# Altium PCB PCB.PcbDoc
Units mm, origin at the board's own origin, x right, y up, seen from the top; angles counter-clockwise.
Board outline 93.85 x 91.31 mm, 2 copper layers (Top Layer, Bottom Layer); 18 components, 20 nets, 160 pads, 0 vias.
Unrouted connection lines stored in the file: 1.
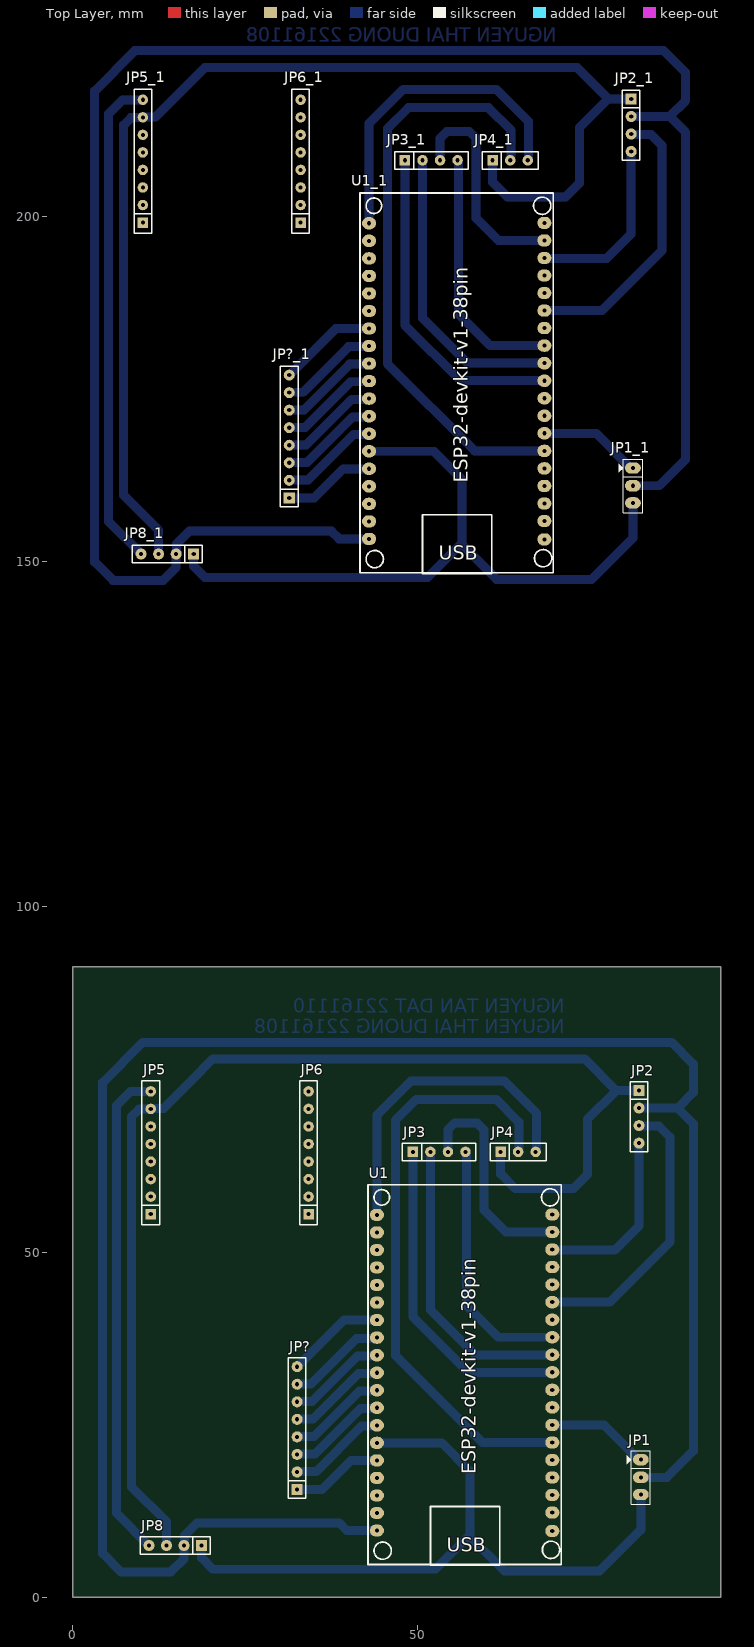
[diagram p0: Top Layer view]
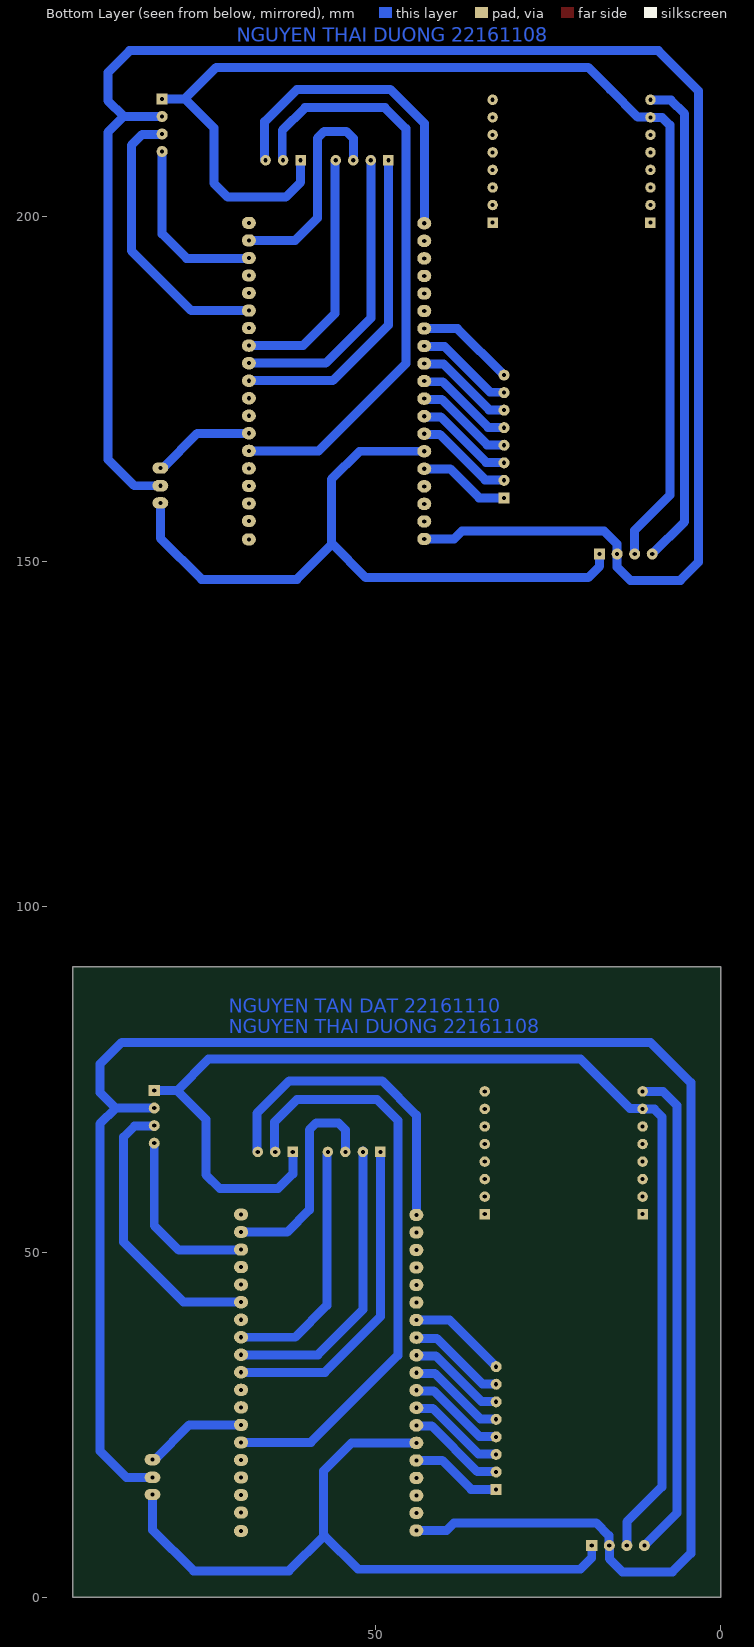
[diagram p1: Bottom Layer view, seen from below]

## Layer stack, top to bottom
Top Solder: solder mask 0.0102, Solder Resist, Dk 3.5
Top Layer: signal copper 0.0356
Dielectric 1: dielectric 0.32, FR-4, Dk 4.8
Bottom Layer: signal copper 0.0356
Bottom Solder: solder mask 0.0102, Solder Resist, Dk 3.5

## Board outline
0,0 93.853,0 93.853,91.313 0,91.313

## Design rules (kind name [scope] priority, off if disabled: settings)
Clearance [All] p1: gap=0.6 ignorepadtopadclearanceinfootprint=FALSE
PolygonConnect [All] p1: connectstyle=Relief reliefconductorwidth=0.254 reliefentries=4 polygonreliefangle="90 Angle" airgapwidth=0.254
RoutingVias [All] p1: holewidth=0.711 width=1.27 viastyle="Through Hole" minholewidth=0.711 minwidth=1.27 maxholewidth=0.711 maxwidth=1.27
SolderMaskExpansion [All] p1: expansion=0.102 istentingtop=FALSE
Width [All] p1: maxlimit=3.81 minlimit=0.711 preferedwidth=1.3
30 further rules are at their usual default settings.

## Classes and differential pairs
component class PCB: JP1 JP2 JP3 JP4 JP5 JP6 JP8 JP? U1

## Components (designator, comment, footprint, x,y, rotation, side; value= is the part's Value field where it differs from the comment)
JP1 "Jumper 3" JP3 82.296,17.399 r270 top value=J3
JP1_1 "Jumper 3" JP3 81.153,161.036 r270 top value=J3 (schematic designator JP1)
JP2 "JP 1x4 2.54" "JP 1x4 DT" 82.042,73.406 r270 top
JP2_1 "JP 1x4 2.54" "JP 1x4 DT" 80.899,217.043 r270 top (schematic designator JP2)
JP3 "JP 1x4 2.54" "JP 1x4 CT" 49.276,64.516 r0 top
JP3_1 "JP 1x4 2.54" "JP 1x4 CT" 48.133,208.153 r0 top (schematic designator JP3)
JP4 "JP 1x3 2.54" "JP 1x3 CT" 61.976,64.516 r0 top
JP4_1 "JP 1x3 2.54" "JP 1x3 CT" 60.833,208.153 r0 top (schematic designator JP4)
JP5 "JP 1x8 2.54" "JP 1x8 CT" 11.303,55.499 r90 top
JP5_1 "JP 1x8 2.54" "JP 1x8 CT" 10.16,199.136 r90 top (schematic designator JP5)
JP6 "JP 1x8 2.54" "JP 1x8 CT" 34.163,55.499 r90 top
JP6_1 "JP 1x8 2.54" "JP 1x8 CT" 33.02,199.136 r90 top (schematic designator JP6)
JP8 "JP 1x4 2.54" "JP 1x4 DT" 18.669,7.493 r180 top
JP8_1 "JP 1x4 2.54" "JP 1x4 DT" 17.526,151.13 r180 top (schematic designator JP8)
JP? "JP 1x8 2.54" "JP 1x8 DT" 32.512,15.621 r90 top
JP?_1 "JP 1x8 2.54" "JP 1x8 DT" 31.369,159.258 r90 top (schematic designator JP?)
U1 "ESP32-DEVKI-V1.0-PIN38" ESP32-DEVKIT-V1.0-38PIN 56.769,32.211 r0 top
U1_1 "ESP32-DEVKI-V1.0-PIN38" ESP32-DEVKIT-V1.0-38PIN 55.626,175.848 r0 top (schematic designator U1)

## Footprints (in the part's own frame and the unit in brackets; to place one, negate y for a bottom-side part, rotate by r counter-clockwise, add the part's x,y. Pads: shape width x height; smd on the part's side, far side on the other; paste and mask are expansions set on the pad)
ESP32-DEVKIT-V1.0-38PIN [mil] "DEVKIT 38 PIN"
  oval 80x70 hole 23.62: 1(-500,912.59) 2(-500,812.59) 3(-500,712.59) 4(-500,612.59) 5(-500,512.59) 6(-500,412.59) 7(-500,312.59) 8(-500,212.59) 9(-500,112.59) 10(-500,12.59) 11(-500,-87.41) 12(-500,-187.41) 13(-500,-287.41) 14(-500,-387.41) 15(-500,-487.41) 16(-500,-587.41) 17(-500,-687.41) 18(-500,-787.41) 19(-500,-887.41) 20(500,-890.09) 21(500,-785.09) 22(500,-685.08) 23(500,-585.08) 24(500,-485.08) 25(500,-385.08) 26(500,-285.08) 27(500,-185.09) 28(500,-85.09) 29(500,14.91) 30(500,114.91) 31(500,214.91) 32(500,314.91) 33(500,414.91) 34(500,514.91) 35(500,614.91) 36(500,714.91) 37(500,814.92) 38(500,914.92)
  silkscreen extent -551,-1085 551,1085, body extent -547,-1092 555,1092, height 269
JP3 [mil] "Jumper 3"
  oval 65x90 hole 23.62: 1(-100,0) 2(1,0) 3(99,0)
  silkscreen extent -150,-81 155,55, body extent -146,-49 154,49, height 354
"JP 1x3 CT" [mm]
  rect 1.52x1.52 hole 0.6: 1(0,0)
  round 1.52 hole 0.6: 2(2.54,0) 3(5.08,0)
  silkscreen extent -1.52,-1.27 6.6,1.27, body extent -1.52,-1.25 6.6,1.25, height 8.51
"JP 1x4 CT" [mm]
  rect 1.52x1.52 hole 0.6: 1(0,0)
  round 1.52 hole 0.6: 2(2.54,0) 3(5.08,0) 4(7.62,0)
  silkscreen extent -1.52,-1.27 9.14,1.27, body extent -1.52,-1.25 9.14,1.25, height 8.51
"JP 1x4 DT" [mm] "4 pins, 1 row, straight, gold plating"
  rect 1.6x1.6 hole 0.6: 1(0,0)
  round 1.6 hole 0.6: 2(2.54,0) 3(5.08,0) 4(7.62,0)
  silkscreen extent -1.27,-1.27 8.89,1.27, body extent -1.27,-1.27 8.89,1.27, height 8.54
"JP 1x8 CT" [mm] "8 row, straight, gold plating"
  rect 1.52x1.52 hole 0.6: 1(0,0)
  round 1.52 hole 0.6: 2(2.54,0) 3(5.08,0) 4(7.62,0) 5(10.16,0) 6(12.7,0) 7(15.24,0) 8(17.78,0)
  silkscreen extent -1.52,-1.27 19.3,1.27, body extent -1.52,-1.25 19.3,1.25, height 8.51
"JP 1x8 DT" [mm] "8 pins, 1 row, straight, gold plating"
  rect 1.6x1.6 hole 0.6: 1(0,0)
  round 1.6 hole 0.6: 2(2.54,0) 3(5.08,0) 4(7.62,0) 5(10.16,0) 6(12.7,0) 7(15.24,0) 8(17.78,0)
  silkscreen extent -1.27,-1.27 19.05,1.27, body extent -1.27,-1.27 19.05,1.27, height 8.54

## Part data
JP1 JP1_1: library part JP3_1
JP2 JP2_1 JP8 JP8_1: library part "JP 1x4 2.54 Duc Thang", "Cắm", Chung_Loai=Cắm, Don_Vi=Con, Ma_Hang=MH000903, Ten_Linh_Kien="Jump Đơn Đực 2.54MM 1x40P Thẳng 11MM"
JP3 JP3_1: library part "JP 1x4 2.54 Cai Thang", "Cắm", Chung_Loai=Cắm, Don_Vi=Con, Ma_Hang=MH004006, Ten_Linh_Kien="Jump Đơn Cái 2.54MM 1x20P Thẳng"
JP4 JP4_1: library part "JP 1x3 2.54 Cai Thang", "Cắm", Chung_Loai=Cắm, Don_Vi=Con, Ma_Hang=MH004006, Ten_Linh_Kien="Jump Đơn Cái 2.54MM 1x20P Thẳng"
JP5 JP5_1 JP6 JP6_1: library part "JP 1x8 2.54 Cai Thang", "Cắm", Chung_Loai=Cắm, Don_Vi=Con, Ma_Hang=MH004006, Ten_Linh_Kien="Jump Đơn Cái 2.54MM 1x20P Thẳng"
JP? JP?_1: library part "JP 1x8 2.54 Duc Thang", "Cắm", Chung_Loai=Cắm, Don_Vi=Con, Ma_Hang=MH000903, Ten_Linh_Kien="Jump Đơn Đực 2.54MM 1x40P Thẳng 11MM"

## Nets (pads, with @x,y where several pads share a name; then routed paths per layer and width w, separated by ;. In a path a pad name is that pad's centre, name@x,y a point inside that pad or via, vN(x,y) a via of type N, cw(c..) or ccw(c..) an arc to the next point about the centre after c; other vN are vias at no path point)
GND: JP1.3 JP2.1 JP4.1 JP5.7 JP8.1 JP8.3 U1.14 | length 277
  Bottom Layer w1.3: JP8.3 13.589,10.922 8.509,16.002 8.509,69.596 9.61,70.697 11.261,70.697 11.345,70.781 13.123,70.781 17.145,74.803 20.32,77.978 74.168,77.978 78.74,73.406 ; JP8.1 18.669,5.715 20.32,4.064 52.523,4.064 57.404,8.945 62.539,3.81 76.327,3.81 82.296,9.779 JP1.3 ; U1.14 53.448,22.371 57.531,18.288 57.531,8.818 ; JP4.1 61.976,61.341 64.135,59.182 72.517,59.182 74.549,61.214 74.549,69.215 78.74,73.406 ; JP2.1 78.74,73.406
NetJP1_1: JP1.1 U1.26 | length 14.9
  Bottom Layer w1.3: U1.26 76.948,24.97 81.978,19.939 JP1.1
NetJP1_2: JP1.2 JP2.2 JP8.2 U1.19 | length 276.4
  Bottom Layer w1.3: U1.19 39.732,9.671 38.608,10.795 18.034,10.795 16.186,8.947 16.186,7.55 JP8.2 16.129,5.588 14.224,3.683 6.985,3.683 4.318,6.35 4.318,74.549 10.16,80.391 86.741,80.391 89.916,77.216 89.916,73.152 87.63,70.866 ; JP2.2 87.63,70.866 ; JP1.2 86.081,17.374 89.916,21.209 89.916,68.58 87.63,70.866
NetJP2_3: JP2.3 U1.33 | length 41
  Bottom Layer w1.3: U1.33 77.802,42.75 86.487,51.435 86.487,66.675 84.893,68.269 82.099,68.269 JP2.3
NetJP2_4: JP2.4 U1.36 | length 26
  Bottom Layer w1.3: U1.36 69.547,50.292 78.486,50.292 82.042,53.848 JP2.4
NetJP3_1: JP3.1 U1.29 | length 47.4
  Bottom Layer w1.3: JP3.1@49.276,64.467 49.276,40.64 57.326,32.59 U1.29
NetJP3_2: JP3.2 U1.30 | length 43.4
  Bottom Layer w1.3: JP3.2@51.816,64.651 51.816,41.656 58.342,35.13 U1.30
NetJP3_3: JP3.3 U1.37 | length 32
  Bottom Layer w1.3: JP3.3 54.356,67.691 55.372,68.707 58.547,68.707 59.563,67.691 59.563,56.134 62.787,52.91 U1.37
NetJP3_4: JP3.4 U1.31 | length 36.1
  Bottom Layer w1.3: JP3.4@57.023,64.076 57.023,42.291 61.644,37.67 U1.31
NetJP4_2: JP4.2 U1.25 | length 86.9
  Bottom Layer w1.3: JP4.2 64.643,64.643 64.643,68.834 61.341,72.136 49.784,72.136 46.736,69.088 46.736,35.052 59.358,22.43 U1.25
NetJP4_3: JP4.3 U1.1 | length 47.2
  Bottom Layer w1.3: U1.1 44.069,69.85 49.022,74.803 62.484,74.803 67.183,70.104 67.183,64.643 JP4.3
NetJP5_8: JP5.8 JP8.4 | length 71.5
  Bottom Layer w1.3: JP8.4 6.35,12.192 6.35,71.247 8.34,73.237 11.261,73.237 JP5.8
NetJP?_1: JP?.1 U1.15 | length 13.3
  Bottom Layer w1.3: JP?.1 36.132,15.621 40.342,19.831 U1.15
NetJP?_2: JP?.2 U1.13 | length 14.4
  Bottom Layer w1.3: JP?.2 32.569,18.218 35.255,18.218 41.856,24.819 43.978,24.819 U1.13
NetJP?_3: JP?.3 U1.12 | length 14.4
  Bottom Layer w1.3: JP?.3 32.569,20.758 35.108,20.758 41.709,27.359 43.978,27.359 U1.12
NetJP?_4: JP?.4 U1.11 | length 14.4
  Bottom Layer w1.3: JP?.4 32.569,23.298 34.961,23.298 41.562,29.899 43.978,29.899 U1.11
NetJP?_5: JP?.5 U1.10 | length 14.4
  Bottom Layer w1.3: JP?.5 32.569,25.838 34.814,25.838 41.415,32.439 43.978,32.439 U1.10
NetJP?_6: JP?.6 U1.9 | length 14.4
  Bottom Layer w1.3: JP?.6 32.569,28.378 34.667,28.378 41.268,34.979 43.978,34.979 U1.9
NetJP?_7: JP?.7 U1.8 | length 14.4
  Bottom Layer w1.3: JP?.7 32.569,30.918 34.52,30.918 41.121,37.519 43.978,37.519 U1.8
NetJP?_8: JP?.8 U1.7 | length 14.4
  Bottom Layer w1.3: JP?.8 39.262,40.151 U1.7
pads on no net: JP1_1.1 JP1_1.2 JP1_1.3 JP2_1.1 JP2_1.2 JP2_1.3 JP2_1.4 JP3_1.1 JP3_1.2 JP3_1.3 JP3_1.4 JP4_1.1 JP4_1.2 JP4_1.3 JP5.1 JP5.2 JP5.3 JP5.4 JP5.5 JP5.6 JP5_1.1 JP5_1.2 JP5_1.3 JP5_1.4 JP5_1.5 JP5_1.6 JP5_1.7 JP5_1.8 JP6.1 JP6.2 JP6.3 JP6.4 JP6.5 JP6.6 JP6.7 JP6.8 JP6_1.1 JP6_1.2 JP6_1.3 JP6_1.4 JP6_1.5 JP6_1.6 JP6_1.7 JP6_1.8 JP8_1.1 JP8_1.2 JP8_1.3 JP8_1.4 JP?_1.1 JP?_1.2 JP?_1.3 JP?_1.4 JP?_1.5 JP?_1.6 JP?_1.7 JP?_1.8 U1.2 U1.3 U1.4 U1.5 U1.6 U1.16 U1.17 U1.18 U1.20 U1.21 U1.22 U1.23 U1.24 U1.27 U1.28 U1.32 U1.34 U1.35 U1.38 U1_1.1 U1_1.2 U1_1.3 U1_1.4 U1_1.5 U1_1.6 U1_1.7 U1_1.8 U1_1.9 U1_1.10 U1_1.11 U1_1.12 U1_1.13 U1_1.14 U1_1.15 U1_1.16 U1_1.17 U1_1.18 U1_1.19 U1_1.20 U1_1.21 U1_1.22 U1_1.23 U1_1.24 U1_1.25 U1_1.26 U1_1.27 U1_1.28 U1_1.29 U1_1.30 U1_1.31 U1_1.32 U1_1.33 U1_1.34 U1_1.35 U1_1.36 U1_1.37 U1_1.38
copper on no net: | length 1113.8
  Bottom Layer w1.3: 9.906,151.13 5.207,155.829 5.207,214.884 7.197,216.874 10.118,216.874 10.16,216.916 ; 12.446,151.13 12.446,154.559 7.366,159.639 7.366,213.233 8.467,214.334 10.118,214.334 10.202,214.418 11.98,214.418 16.002,218.44 19.177,221.615 73.025,221.615 77.597,217.043 ; 17.526,151.13 17.526,149.352 19.177,147.701 51.38,147.701 56.261,152.582 61.396,147.447 75.184,147.447 81.153,153.416 81.153,158.521 ; 31.369,159.258 34.989,159.258 39.199,163.468 42.926,163.468 ; 31.369,161.798 31.426,161.855 34.112,161.855 40.713,168.456 42.835,168.456 42.926,168.548 ; 31.369,164.338 31.426,164.395 33.965,164.395 40.566,170.996 42.835,170.996 42.926,171.088 ; 31.369,166.878 31.426,166.935 33.818,166.935 40.419,173.536 42.835,173.536 42.926,173.628 ; 31.369,169.418 31.426,169.475 33.671,169.475 40.272,176.076 42.835,176.076 42.926,176.168 ; 31.369,171.958 31.426,172.015 33.524,172.015 40.125,178.616 42.835,178.616 42.926,178.708 ; 31.369,174.498 31.426,174.555 33.377,174.555 39.978,181.156 42.835,181.156 42.926,181.248 ; 31.369,177.038 38.119,183.788 42.926,183.788 ; 42.926,153.308 38.589,153.308 37.465,154.432 16.891,154.432 15.043,152.584 15.043,151.187 14.986,151.13 14.986,149.225 13.081,147.32 5.842,147.32 3.175,149.987 3.175,218.186 9.017,224.028 85.598,224.028 88.773,220.853 88.773,216.789 86.487,214.503 ; 42.926,166.008 52.305,166.008 56.388,161.925 56.388,152.455 ; 42.926,193.948 43.053,193.948 ; 42.926,199.028 42.926,213.487 47.879,218.44 61.341,218.44 66.04,213.741 66.04,208.28 65.913,208.153 ; 44.069,50.311 44.196,50.311 ; 48.133,208.104 48.133,184.277 56.183,176.227 68.326,176.227 ; 50.673,208.288 50.673,185.293 57.199,178.767 68.326,178.767 ; 53.213,208.153 53.213,211.328 54.229,212.344 57.404,212.344 58.42,211.328 58.42,199.771 61.644,196.547 68.326,196.547 ; 55.88,207.713 55.88,185.928 60.501,181.307 68.326,181.307 ; 60.833,208.153 60.833,204.978 62.992,202.819 71.374,202.819 73.406,204.851 73.406,212.852 77.597,217.043 ; 63.373,208.153 63.5,208.28 63.5,212.471 60.198,215.773 48.641,215.773 45.593,212.725 45.593,178.689 58.215,166.067 68.326,166.067 ; 68.326,168.607 75.805,168.607 80.835,163.576 81.153,163.576 ; 68.326,186.387 76.659,186.387 85.344,195.072 85.344,210.312 83.75,211.906 80.956,211.906 80.899,211.963 ; 68.326,194.007 68.404,193.929 77.343,193.929 80.899,197.485 80.899,209.423 ; 80.899,214.503 86.487,214.503 ; 80.899,217.043 77.597,217.043 ; 81.153,161.011 84.938,161.011 88.773,164.846 88.773,212.217 86.487,214.503

## Other copper
Bottom Layer:
  text "NGUYEN TAN DAT 22161110 / NGUYEN THAI DUONG 22161108" at 70.104,225.343 h2
  text "NGUYEN TAN DAT 22161110 / NGUYEN THAI DUONG 22161108" at 71.247,81.706 h2

## Text inside footprints (layer, text, board x,y; h text height)
U1: Top Overlay "ESP32-devkit-v1-38pin" at 58.36,17.799 h2.03 r90; Top Overlay "USB" at 54.169,6.623 h2.03
U1_1: Top Overlay "ESP32-devkit-v1-38pin" at 57.217,161.436 h2.03 r90; Top Overlay "USB" at 53.026,150.26 h2.03